# Altium PCB Hall_Voltage.PcbDoc
Units mm, origin at the board's own origin, x right, y up, seen from the top; angles counter-clockwise.
Board outline 100 x 100 mm, 2 copper layers (Top Layer, Bottom Layer); 40 components, 28 nets, 120 pads, 0 vias.
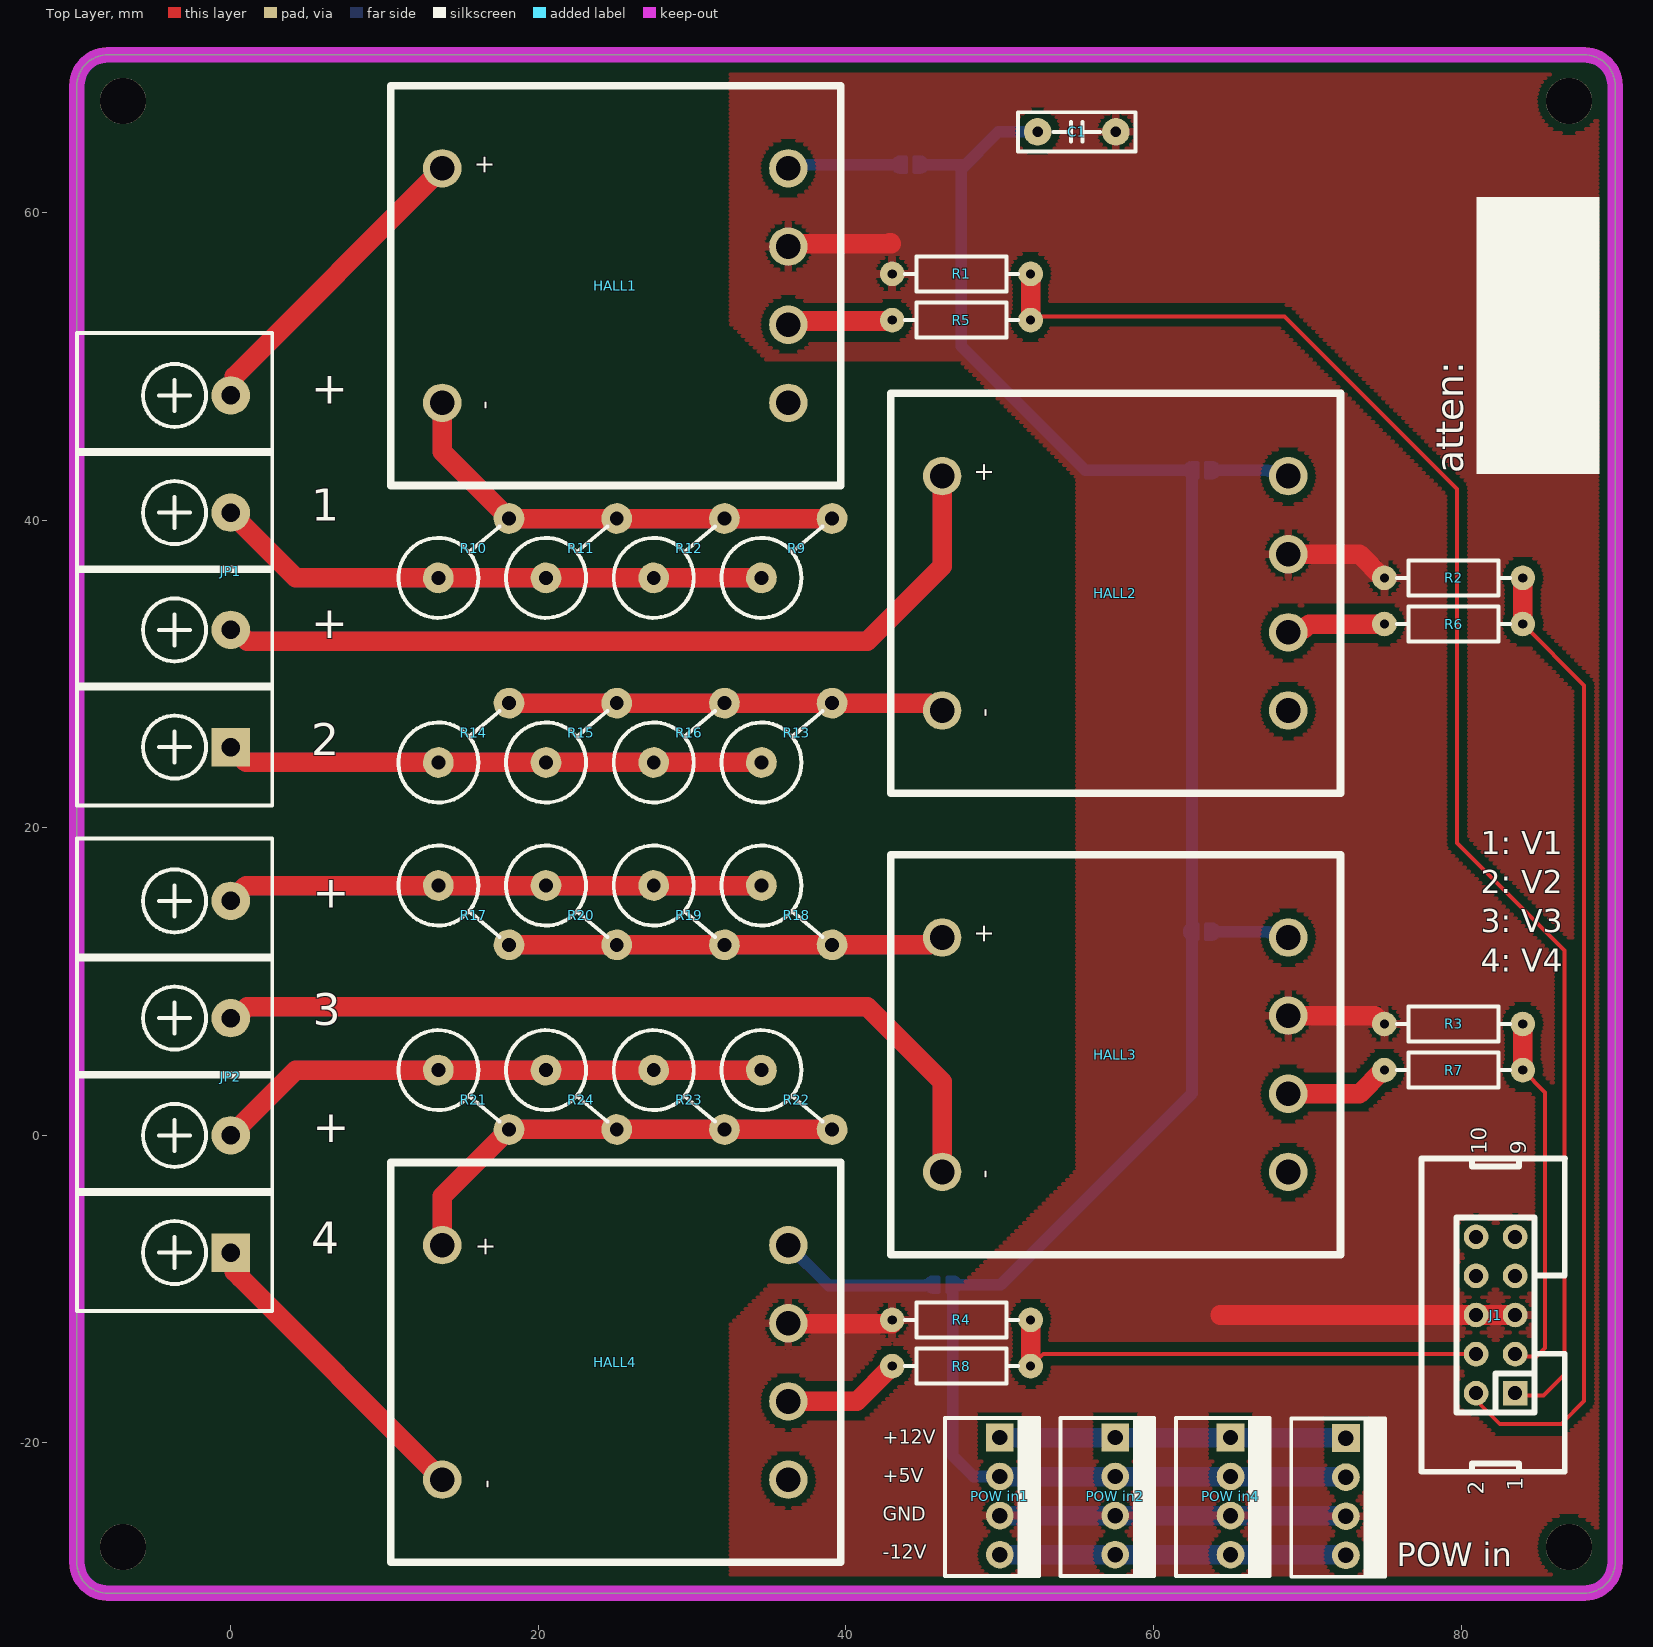
[diagram p0: Top Layer view]
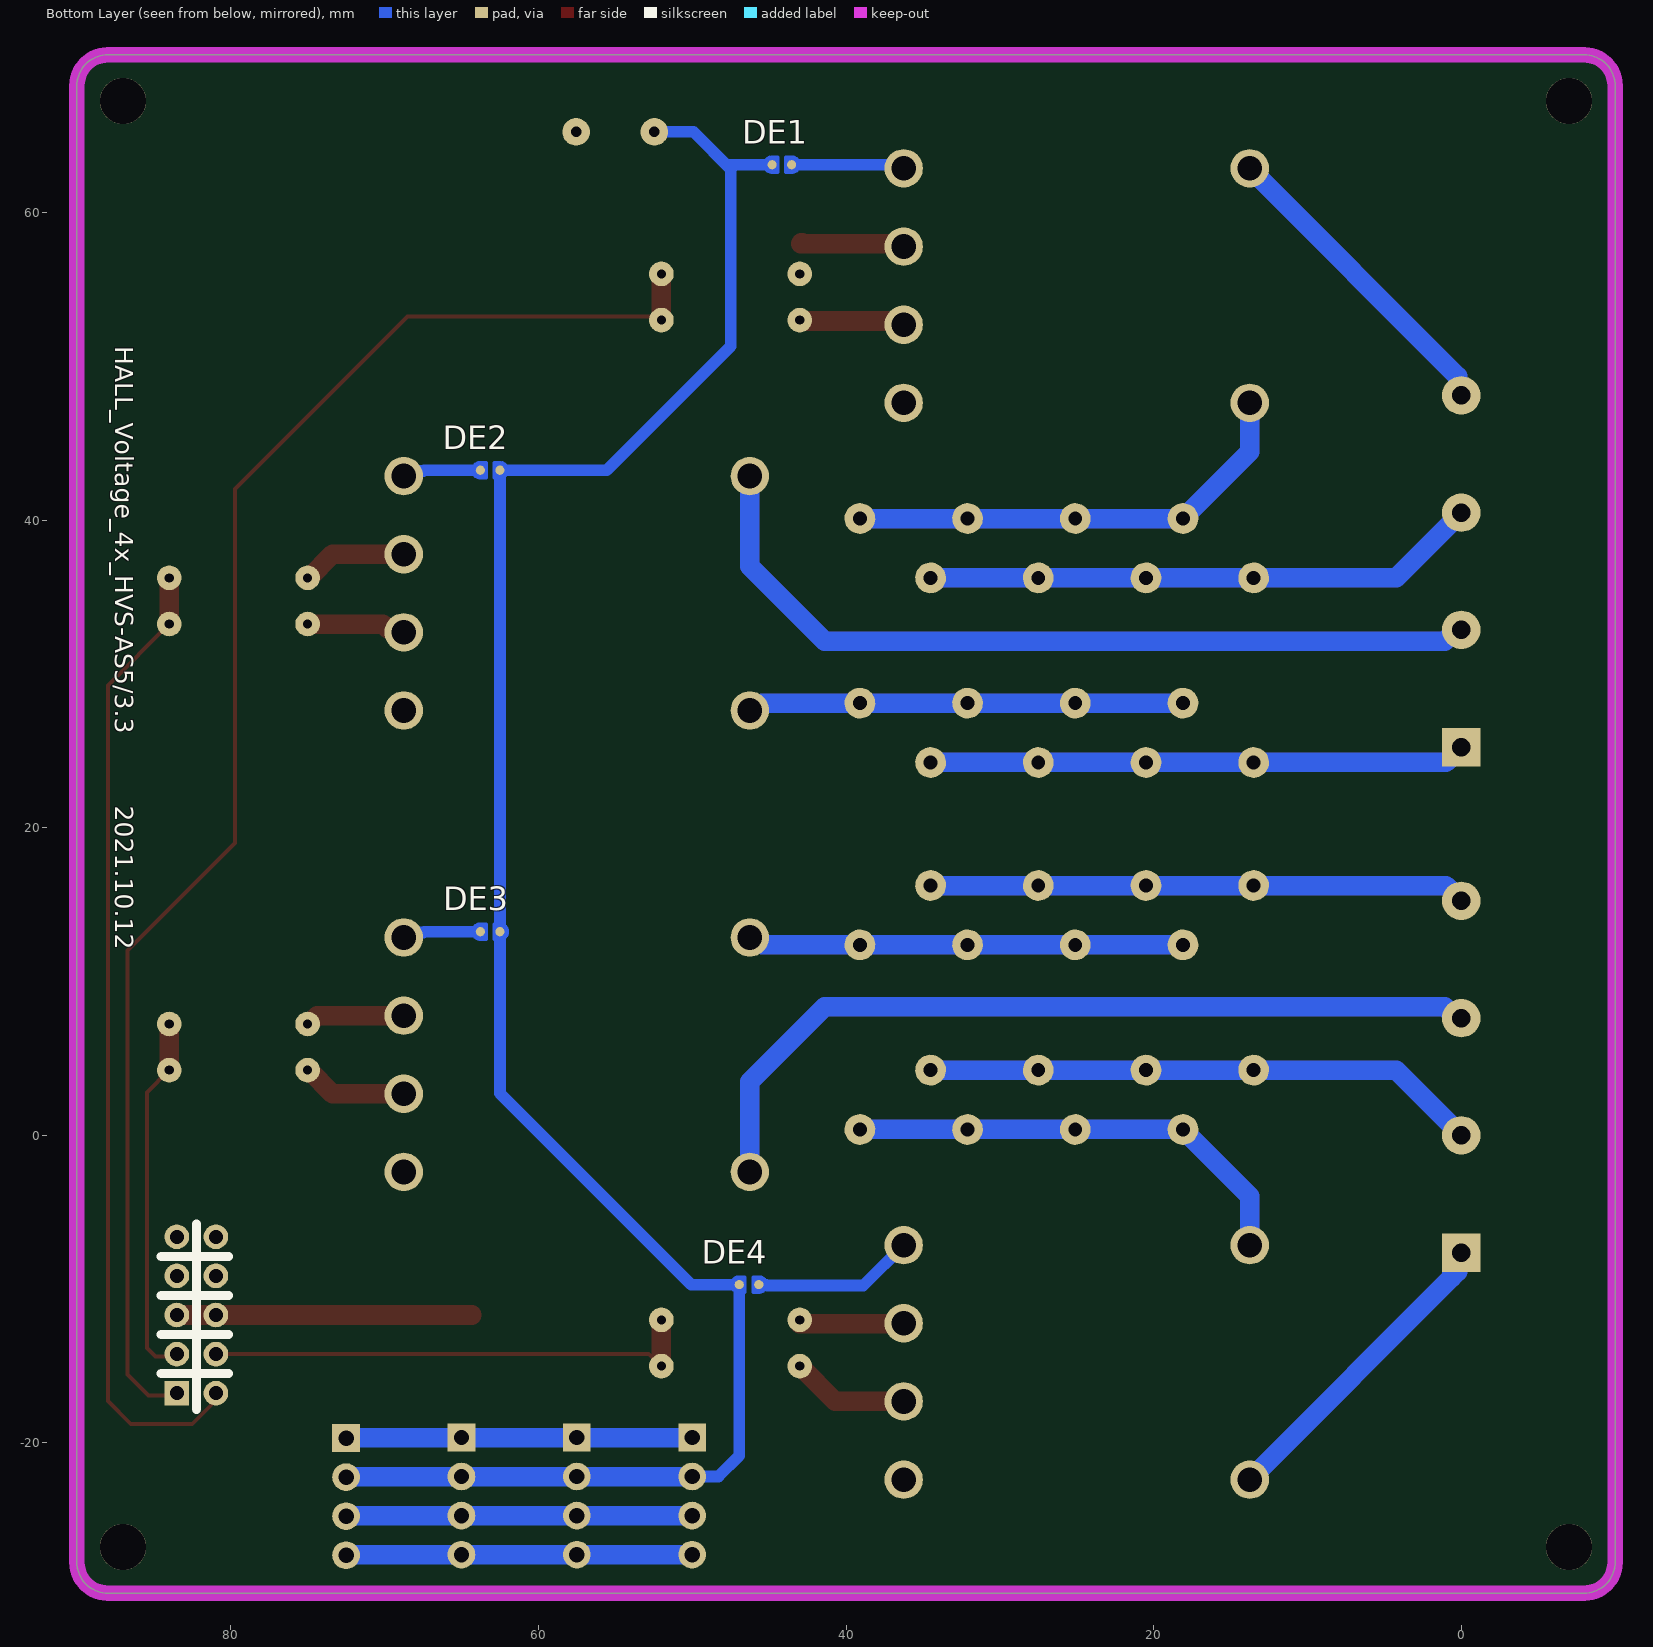
[diagram p1: Bottom Layer view, seen from below]

## Layer stack, top to bottom
Top Solder: solder mask 0.0102, Solder Resist, Dk 3.5
Top Layer: signal copper 0.0356
Dielectric 1: dielectric 0.32, FR-4, Dk 4.8
Bottom Layer: signal copper 0.0356
Bottom Solder: solder mask 0.0102, Solder Resist, Dk 3.5

## Board outline
-10,-27.76 -10,68.24 cw(c-8,68.24) -8,70.24 88,70.24 cw(c88,68.24) 90,68.24 90,-27.76 cw(c88,-27.76) 88,-29.76 -8,-29.76 cw(c-8,-27.76)

## Design rules (kind name [scope] priority, off if disabled: settings)
Clearance [All] p1: gap=0.508 ignorepadtopadclearanceinfootprint=FALSE except(0: Arc-Hole Track-Hole SMDPad-Hole THPad-Hole Via-Hole Text-Hole; 0.254: Arc-Arc Arc-Track Arc-SMDPad Arc-THPad Arc-Via Arc-Text Track-Track Track-SMDPad Track-THPad Track-Via Track-Text SMDPad-SMDPad SMDPad-THPad SMDPad-Via SMDPad-Text THPad-THPad THPad-Via THPad-Text Via-Via Via-Text Text-Text)
PolygonConnect [All] p1: thpad.connectstyle=Relief thpad.reliefconductorwidth=0.508 thpad.reliefentries=4 thpad.polygonreliefangle="90 Angle" thpad.airgapwidth=0.254 smdpad.connectstyle=Relief smdpad.reliefconductorwidth=0.254 smdpad.reliefentries=4 smdpad.polygonreliefangle="90 Angle" smdpad.airgapwidth=0.254 via.connectstyle=Direct via.reliefconductorwidth=0.254 via.reliefentries=4 via.polygonreliefangle="90 Angle" via.airgapwidth=0.254
RoutingVias [All] p1: holewidth=0.711 width=1.27 viastyle="Through Hole" minholewidth=0.711 minwidth=1.27 maxholewidth=0.711 maxwidth=1.27
SolderMaskExpansion [All] p1: expansion=0.102 istentingtop=FALSE
Width [All] p1: maxlimit=2.54 minlimit=0.254 preferedwidth=0.254
30 further rules are at their usual default settings.

## Components (designator, comment, footprint, x,y, rotation, side; value= is the part's Value field where it differs from the comment)
C1 "105" MLCC5.08-A 55,65.24 r0 top
DE1 "DEBUG PAD" DEBUG_B#1 44.17,63.1 r180 bottom
DE2 "DEBUG PAD" DEBUG_B#2 63.135,43.24 r0 bottom
DE3 "DEBUG PAD" DEBUG_B#3 63.135,13.24 r0 bottom
DE4 "DEBUG PAD" DEBUG_B#4 46.304,-9.705 r180 bottom
HALL1 "HVS AS5/3.3" "HVS AS5/3.3" 25,55.24 r90 top
HALL2 "HVS AS5/3.3" "HVS AS5/3.3" 57.5,35.24 r90 top
HALL3 "HVS AS5/3.3" "HVS AS5/3.3" 57.5,5.24 r90 top
HALL4 "HVS AS5/3.3" "HVS AS5/3.3" 25,-14.76 r90 top
J1 "Header 5X2" IDC2.54-LI-2x5P 83.5,-16.76 r90 top
JP1 "HDR-1X4" KF7620-4P -3.65,36.67 r90 top
JP2 "HDR-1X4" KF7620-4P -3.65,3.81 r90 top
"POW in" "HDR-1X4" KF2510-LI-4P 72.5,-23.49 r270 top (schematic designator "POW in3")
"POW in1" "HDR-1X4" KF2510-LI-4P 50,-23.45 r270 top
"POW in2" "HDR-1X4" KF2510-LI-4P 57.5,-23.45 r270 top
"POW in4" "HDR-1X4" KF2510-LI-4P 65,-23.45 r270 top
R1 "10K" "RS 1/4W" 47.5,56 r180 top
R2 "10K" "RS 1/4W" 79.5,36.24 r180 top
R3 "10K" "RS 1/4W" 79.5,7.24 r180 top
R4 "10K" "RS 1/4W" 47.5,-12 r180 top
R5 "10K" "RS 1/4W" 47.5,53 r0 top
R6 "10K" "RS 1/4W" 79.5,33.24 r0 top
R7 "10K" "RS 1/4W" 79.5,4.24 r0 top
R8 "10K" "RS 1/4W" 47.5,-15 r0 top
R9 "51k" "RS 2W-V6" 34.5,36.24 r40 top
R10 "51k" "RS 2W-V6" 13.5,36.24 r40 top
R11 "51k" "RS 2W-V6" 20.5,36.24 r40 top
R12 "51k" "RS 2W-V6" 27.5,36.24 r40 top
R13 "51k" "RS 2W-V6" 34.5,24.24 r40 top
R14 "51k" "RS 2W-V6" 13.5,24.24 r40 top
R15 "51k" "RS 2W-V6" 20.5,24.24 r40 top
R16 "51k" "RS 2W-V6" 27.5,24.24 r40 top
R17 "51k" "RS 2W-V6" 13.5,16.24 r320 top
R18 "51k" "RS 2W-V6" 34.5,16.24 r320 top
R19 "51k" "RS 2W-V6" 27.5,16.24 r320 top
R20 "51k" "RS 2W-V6" 20.5,16.24 r320 top
R21 "51k" "RS 2W-V6" 13.5,4.24 r320 top
R22 "51k" "RS 2W-V6" 34.5,4.24 r320 top
R23 "51k" "RS 2W-V6" 27.5,4.24 r320 top
R24 "51k" "RS 2W-V6" 20.5,4.24 r320 top

## Footprints (in the part's own frame and the unit in brackets; to place one, negate y for a bottom-side part, rotate by r counter-clockwise, add the part's x,y. Pads: shape width x height; smd on the part's side, far side on the other; paste and mask are expansions set on the pad)
DEBUG_B#1 [mm] "调试断点焊盘"
  round 0.6 smd paste-0.6: 1(-0.635,0) 2(0.635,0)
  Top Layer region: 0.254,-0.508 0.762,-0.508 0.908,-0.479 1.031,-0.396 1.114,-0.273 1.143,-0.127 1.143,-0.127 1.143,0 1.104,0.194 0.994,0.359 0.829,0.469 0.635,0.508 0.635,0.508 0.254,0.508
  Top Layer region: -0.254,0.508 -0.762,0.508 -0.908,0.479 -1.031,0.396 -1.114,0.273 -1.143,0.127 -1.143,0.127 -1.143,0 -1.104,-0.194 -0.994,-0.359 -0.829,-0.469 -0.635,-0.508 -0.635,-0.508 -0.254,-0.508
  Top Layer lines w0.203: 1.143,0 cw(c0.635,0) 0.635,-0.508 0.254,-0.508 0.254,0 0.254,0.508 0.635,0.508 cw(c0.635,0) 1.143,0 ; -0.254,-0.508 -0.254,0 -0.254,0.508 -0.635,0.508 ccw(c-0.635,0) -1.143,0 ccw(c-0.635,0) -0.635,-0.508 -0.254,-0.508
DEBUG_B#2 [mm] "调试断点焊盘"
  round 0.6 smd paste-0.6: 1(-0.635,0) 2(0.635,0)
  Top Layer region: 0.254,-0.508 0.762,-0.508 0.908,-0.479 1.031,-0.396 1.114,-0.273 1.143,-0.127 1.143,-0.127 1.143,0 1.104,0.194 0.994,0.359 0.829,0.469 0.635,0.508 0.635,0.508 0.254,0.508
  Top Layer region: -0.254,0.508 -0.762,0.508 -0.908,0.479 -1.031,0.396 -1.114,0.273 -1.143,0.127 -1.143,0.127 -1.143,0 -1.104,-0.194 -0.994,-0.359 -0.829,-0.469 -0.635,-0.508 -0.635,-0.508 -0.254,-0.508
  Top Layer lines w0.203: -1.143,0 ccw(c-0.635,0) -0.994,-0.359 ccw(c-0.635,0) -0.635,-0.508 -0.254,-0.508 -0.254,0 -0.254,0.508 -0.635,0.508 ccw(c-0.635,0) -1.143,0 ; 0.254,0.508 0.635,0.508 cw(c0.635,0) 1.143,0 cw(c0.635,0) 0.635,-0.508 0.254,-0.508 0.254,0 0.254,0.508
DEBUG_B#3 [mm] "调试断点焊盘"
  round 0.6 smd paste-0.6: 1(-0.635,0) 2(0.635,0)
  Top Layer region: 0.254,-0.508 0.762,-0.508 0.908,-0.479 1.031,-0.396 1.114,-0.273 1.143,-0.127 1.143,-0.127 1.143,0 1.104,0.194 0.994,0.359 0.829,0.469 0.635,0.508 0.635,0.508 0.254,0.508
  Top Layer region: -0.254,0.508 -0.762,0.508 -0.908,0.479 -1.031,0.396 -1.114,0.273 -1.143,0.127 -1.143,0.127 -1.143,0 -1.104,-0.194 -0.994,-0.359 -0.829,-0.469 -0.635,-0.508 -0.635,-0.508 -0.254,-0.508
  Top Layer lines w0.203: -0.635,0.508 ccw(c-0.635,0) -0.635,-0.508 -0.254,-0.508 -0.254,0 -0.254,0.508 -0.635,0.508 ; 0.254,0.508 0.635,0.508 cw(c0.635,0) 1.143,0 cw(c0.635,0) 0.635,-0.508 0.254,-0.508 0.254,0 0.254,0.508
DEBUG_B#4 [mm] "调试断点焊盘"
  round 0.6 smd paste-0.6: 1(-0.635,0) 2(0.635,0)
  Top Layer region: 0.254,-0.508 0.762,-0.508 0.908,-0.479 1.031,-0.396 1.114,-0.273 1.143,-0.127 1.143,-0.127 1.143,0 1.104,0.194 0.994,0.359 0.829,0.469 0.635,0.508 0.635,0.508 0.254,0.508
  Top Layer region: -0.254,0.508 -0.762,0.508 -0.908,0.479 -1.031,0.396 -1.114,0.273 -1.143,0.127 -1.143,0.127 -1.143,0 -1.104,-0.194 -0.994,-0.359 -0.829,-0.469 -0.635,-0.508 -0.635,-0.508 -0.254,-0.508
  Top Layer lines w0.203: 1.143,0 ccw(c0.635,0) 1.123,0.14 ccw(c0.635,0) 1.104,0.194 ccw(c0.635,0) 0.635,0.508 0.254,0.508 0.254,0 0.254,-0.508 0.635,-0.508 ccw(c0.635,0) 1.143,0 ; -0.254,-0.508 -0.254,0 -0.254,0.508 -0.635,0.508 ccw(c-0.635,0) -0.994,0.359 ccw(c-0.635,0) -1.098,0.209 ccw(c-0.635,0) -1.143,0 ccw(c-0.635,0) -0.994,-0.359 ccw(c-0.635,0) -0.635,-0.508 -0.254,-0.508
"HVS AS5/3.3" [mm] "霍尔电压传感器"
  round 2.5 hole 1.6: 1(7.62,11.25) 2(-7.62,11.25) 3(7.62,-11.25) 4(2.54,-11.25) 5(-2.54,-11.25) 6(-7.62,-11.25)
  silkscreen extent -13,-14.65 13,14.59
IDC2.54-LI-2x5P [mm] "10P简易牛角座"
  rect 1.6x1.6 hole 0.9: 1(0,0)
  round 1.6 hole 0.9: 2(0,2.54) 3(2.54,0) 4(2.54,2.54) 5(5.08,0) 6(5.08,2.54) 7(7.62,0) 8(7.62,2.54) 9(10.16,0) 10(10.16,2.54)
  silkscreen extent -5.11,-3.23 15.27,6.1, body extent -5.08,-3.08 15.24,5.77, height 9.17
KF2510-LI-4P [mm] "接插件/2A"
  rect 1.8x1.8 hole 1: 1(-3.81,0)
  round 1.8 hole 1: 2(-1.27,0) 3(1.27,0) 4(3.81,0)
  silkscreen extent -5.08,-3.56 5.21,2.54, body extent -5.08,-3.5 5.08,2.4, height 11.05
KF7620-4P [mm] "30.5*12*12mm(长宽高)"
  rect 2.5x2.5 hole 1.2: 1(-11.43,-3.65)
  round 2.5 hole 1.2: 2(-3.81,-3.65) 3(3.81,-3.65) 4(11.43,-3.65)
  silkscreen extent -15.24,-6.35 15.49,6.35, body extent -15.24,-6.2 15.94,6.2, height 12.45
MLCC5.08-A [mm] "独石电容，脚距5.08mmhttps://item.taobao.com/item.htm?ft=t&id=613637044352"
  round 1.8 hole 0.7: 1(-2.54,0) 2(2.54,0)
  silkscreen extent -3.81,-1.27 3.81,1.27, body extent -2.79,-1 2.79,1, height 3.71
"RS 1/4W" [mm] "直插色环电阻，脚距9mm，直径2.3mm  https://item.taobao.com/item.htm?ft=t&id=613637044352"
  round 1.6 hole 0.6: 1(-4.5,0) 2(4.5,0)
  silkscreen extent -3.68,-1.14 3.68,1.14, body extent -4.72,-1.16 4.73,1.16, height 2.32
"RS 2W-V6" [mm] "直插色环电阻，脚距6mm，直径5mm"
  round 2 hole 0.9: 1(6,0) 2(0,0)
  silkscreen extent -2.6,-2.6 5.2,2.6, body extent -2.51,-2.51 6.4,2.51, height 17.6

## Part data
C1: library part C-MLCC, "独石电容", BOM名称=独石电容, 下单链接=https://item.taobao.com/item.htm?ft=t&id=613637044352, 淘宝ID=小糖豆的小窝窝
DE1 DE2 DE3 DE4: library part DEBUG, "调试断点焊盘", BOM名称=调试断点焊盘, 下单链接=https://item.taobao.com/item.htm?ft=t&id=613637044352, 淘宝ID=小糖豆的小窝窝
HALL1 HALL2 HALL3 HALL4: "霍尔电压传感器"
J1: "5*2P接插件", BOM名称=5*2P接插件, 下单链接=https://item.taobao.com/item.htm?ft=t&id=613637044352, 淘宝ID=小糖豆的小窝窝
JP1 JP2 "POW in" "POW in1" "POW in2" "POW in4": library part "Header 4", "4P接插件", BOM名称=4P接插件, 下单链接=https://item.taobao.com/item.htm?ft=t&id=613637044352, 淘宝ID=小糖豆的小窝窝
R1 R2 R3 R4 R5 R6 R7 R8 R9 R10 R11 R12 R13 R14 R15 R16 R17 R18 R19 R20 R21 R22 R23 R24: library part Res, "色环电阻", BOM名称=色环电阻, 下单链接=https://item.taobao.com/item.htm?ft=t&id=613637044352, 淘宝ID=小糖豆的小窝窝

## Free pads (board coordinates)
  round 3 hole 3: Q(-7,-26.76) Q(-7,67.24) Q(87,-26.76) Q(87,67.24)

## Nets (pads, with @x,y where several pads share a name; then routed paths per layer and width w, separated by ;. In a path a pad name is that pad's centre, name@x,y a point inside that pad or via, vN(x,y) a via of type N, cw(c..) or ccw(c..) an arc to the next point about the centre after c; other vN are vias at no path point)
1: J1.1 R1.1 R5.2 | length 99.7
  Top Layer w0.254: R5.2@52,53.24 68.5,53.24 79.73,42.01 79.73,19.01 86.715,12.025 86.715,-15.545 85.35,-16.91 83.65,-16.91 J1.1
  Top Layer w1.27: R5.2 R1.1
2: J1.2 R2.1 R6.2 | length 64.5
  Top Layer w0.254: J1.2@80.96,-16.176 80.96,-17.22 82.5,-18.76 86.5,-18.76 87.985,-17.275 87.985,29.255 R6.2
  Top Layer w1.27: R6.2 R2.1
3: J1.3 R3.1 R7.2 | length 23.9
  Top Layer w0.254: J1.3 83.65,-14.37 84.89,-14.37 85.445,-13.815 85.445,2.795 R7.2
  Top Layer w1.27: R7.2 R3.1
4: J1.4 R4.1 R8.2 | length 31.5
  Top Layer w0.254: R8.2@52.581,-14.461 52.822,-14.22 J1.4
  Top Layer w1.27: R8.2 R4.1
+5: "POW in1.2" "POW in2.2" "POW in4.2" "POW in.2" C1.1 DE1.1 DE2.1 DE3.1 DE4.1 | length 135.3
  Bottom Layer w0.762: 45.313,63.1 47.548,63.1 47.661,62.987 ; 46.939,-10.065 46.939,-10.213 46.939,-20.827 48.293,-22.18 50,-22.18 ; 47.447,-9.705 50.055,-9.705 62.5,2.74 62.5,12.732 ; 47.457,62.783 49.914,65.24 C1.1 ; 47.5,62.74 47.5,51.302 55.562,43.24 61.992,43.24 62.141,43.24 DE2.1 62.5,42.732 62.5,13.748 DE3.1
  Bottom Layer w1.27: 50,-22.18 50.02,-22.2 57.5,-22.2 65,-22.2 72.48,-22.2 72.5,-22.22
+12: "POW in1.1" "POW in2.1" "POW in4.1" "POW in.1" | length 22.5
  Bottom Layer w1.27: 50,-19.64 50.02,-19.66 72.48,-19.66 72.5,-19.68
-12: "POW in1.4" "POW in2.4" "POW in4.4" "POW in.4" | length 22.5
  Bottom Layer w1.27: 50,-27.26 50.02,-27.28 72.48,-27.28 72.5,-27.3
GND: "POW in1.3" "POW in2.3" "POW in4.3" "POW in.3" C1.2 HALL1.4 HALL2.4 HALL3.4 HALL4.4 J1.5 J1.6 R1.2 R2.2 R3.2 R4.2 | length 68.6
  Top Layer w1.27: HALL4.4 36.29,-12.26 R4.2@43,-12.26 ; HALL1.4 36.427,57.957 42.934,57.957 ; 42.845,58.02 42.9,58.02 ; 64.34,-11.68 J1.6 J1.5 ; HALL3.4 74.371,7.78 74.911,7.24 R3.2 ; HALL2.4 73.371,37.78 74.911,36.24 R2.2
  Bottom Layer w1.27: 50,-24.72 50.02,-24.74 72.48,-24.74 72.5,-24.76
NetDE1_2: DE1.2 HALL1.3 | length 7.4
  Bottom Layer w0.762: HALL1.3 36.49,63.1 DE1.2
NetDE2_2: DE2.2 HALL2.3 | length 5.1
  Bottom Layer w0.762: DE2.2 64.278,43.24 67.435,43.24 67.482,43.193 68.417,43.193 HALL2.3
NetDE3_2: DE3.2 HALL3.3 | length 5.1
  Bottom Layer w0.762: DE3.2 64.278,13.24 67.435,13.24 67.482,13.193 68.417,13.193 HALL3.3
NetDE4_2: DE4.2 HALL4.3 | length 10
  Bottom Layer w0.762: HALL4.3 38.87,-9.76 45.107,-9.76 45.161,-9.705
NetHALL1_1: HALL1.1 JP1.4 | length 40.9
  Top Layer w1.27: JP1.4 0.235,48.335 0.235,49.345 HALL1.1
  Bottom Layer w1.27: JP1.4 0.235,48.335 0.235,49.345 HALL1.1
NetHALL1_2: HALL1.2 R9.1 R10.1 R11.1 R12.1 | length 60.6
  Top Layer w1.27: HALL1.2 13.75,44.443 R10.1 R11.1 R12.1 R9.1
  Bottom Layer w1.27: HALL1.2 13.75,44.443 R10.1 R11.1 R12.1 R9.1
NetHALL1_5: HALL1.5 R5.1 | length 6.7
  Top Layer w1.27: HALL1.5 36.485,52.935 37.355,52.935 37.36,52.94 42.5,52.94 R5.1@42.845,52.94
NetHALL2_1: HALL2.1 JP1.2 | length 108.9
  Top Layer w1.27: JP1.2 0.333,32.86 1.085,32.108 41.368,32.108 46.25,36.99 HALL2.1
  Bottom Layer w1.27: JP1.2 0.333,32.86 1.085,32.108 41.368,32.108 46.25,36.99 HALL2.1
NetHALL2_2: HALL2.2 R13.1 R14.1 R15.1 R16.1 | length 56.7
  Top Layer w1.27: R14.1 R15.1 R16.1 R13.1 45.44,28.097 45.917,27.62 HALL2.2
  Bottom Layer w1.27: R14.1 R15.1 R16.1 R13.1 45.44,28.097 45.917,27.62 HALL2.2
NetHALL2_5: HALL2.5 R6.1 | length 6.5
  Top Layer w1.27: HALL2.5 68.985,32.935 69.804,32.935 70.109,33.24 R6.1
NetHALL3_1: HALL3.1 R17.1 R18.1 R19.1 R20.1 | length 56.7
  Top Layer w1.27: R17.1 R20.1 R19.1 R18.1 45.44,12.383 45.917,12.86 HALL3.1
  Bottom Layer w1.27: R17.1 R20.1 R19.1 R18.1 45.44,12.383 45.917,12.86 HALL3.1
NetHALL3_2: HALL3.2 JP2.3 | length 108.9
  Top Layer w1.27: JP2.3 0.333,7.62 1.085,8.372 41.368,8.372 46.25,3.49 HALL3.2
  Bottom Layer w1.27: JP2.3 0.333,7.62 1.085,8.372 41.368,8.372 46.25,3.49 HALL3.2
NetHALL3_5: HALL3.5 R7.1 | length 6.9
  Top Layer w1.27: HALL3.5 73.371,2.7 74.911,4.24 R7.1
NetHALL4_1: HALL4.1 R21.1 R22.1 R23.1 R24.1 | length 60.6
  Top Layer w1.27: HALL4.1 13.75,-3.963 R21.1 R24.1 R23.1 R22.1
  Bottom Layer w1.27: HALL4.1 13.75,-3.963 R21.1 R24.1 R23.1 R22.1
NetHALL4_2: HALL4.2 JP2.1 | length 44.7
  Top Layer w1.27: 0.615,-9.245 0.615,-8.235 JP2.1 0.235,-7.855 0.235,-8.865 HALL4.2
  Bottom Layer w1.27: 0.615,-9.245 0.615,-8.235 JP2.1 0.235,-7.855 0.235,-8.865 HALL4.2
NetHALL4_5: HALL4.5 R8.1 | length 7.7
  Top Layer w1.27: HALL4.5 40.7,-17.3 R8.1
NetJP1_1: JP1.1 R13.2 R14.2 R15.2 R16.2 | length 69.8
  Top Layer w1.27: JP1.1 1,24.24 R14.2 R15.2 R16.2 R13.2
  Bottom Layer w1.27: JP1.1 1,24.24 R14.2 R15.2 R16.2 R13.2
NetJP1_3: JP1.3 R9.2 R10.2 R11.2 R12.2 | length 72.5
  Top Layer w1.27: JP1.3 4.24,36.24 R10.2 R11.2 R12.2 R9.2
  Bottom Layer w1.27: JP1.3 4.24,36.24 R10.2 R11.2 R12.2 R9.2
NetJP2_2: JP2.2 R21.2 R22.2 R23.2 R24.2 | length 72.5
  Top Layer w1.27: JP2.2 4.24,4.24 R21.2 R24.2 R23.2 R22.2
  Bottom Layer w1.27: JP2.2 4.24,4.24 R21.2 R24.2 R23.2 R22.2
NetJP2_4: JP2.4 R17.2 R18.2 R19.2 R20.2 | length 69.8
  Top Layer w1.27: JP2.4 1,16.24 R17.2 R20.2 R19.2 R18.2
  Bottom Layer w1.27: JP2.4 1,16.24 R17.2 R20.2 R19.2 R18.2
pads on no net: HALL1.6 HALL2.6 HALL3.6 HALL4.6 J1.7 J1.8 J1.9 J1.10

## Polygon pours and split planes (outlines as drawn)
GND on Top Layer "NONET_L02_P-001" (hatched Horizontal grid 0.254 track 0.254, remove dead copper, pour order 2): 32.5,52.74 35,50.24 47.5,50.24 55,42.74 55,-2.26 47.5,-9.76 35,-9.76 32.5,-12.26 32.5,-29.76 90,-29.76 90,70.24 32.5,70.24
no net on Top Layer "NONET_L02_P-001" (solid, remove dead copper, pour order 3): 45,-22.26

## Keep-outs
Keep-Out Layer:
  lines w1.016: 90,68.24 ccw(c88,68.24) 88,70.24 -8,70.24 ccw(c-8,68.24) -10,68.24 -10,-27.76 ccw(c-8,-27.76) -8,-29.76 88,-29.76 ccw(c88,-27.76) 90,-27.76 90,68.24 ; 90,68.24 90,68.24

## Silkscreen, mask and mechanical layers (free items; w line width, h text height)
Top Overlay:
  region: 89,43 89,61 81,61 81,43
  text "+" at 5.242,46.883 h3.56
  text "atten:" at 80.702,43.055 h3.05 r90
  text "1" at 5.242,39.263 h3.56
  text "+" at 5.242,31.643 h3.56
  text "2" at 5.242,24.023 h3.56
  text "1: V1" at 81.28,17.78 h2.54
  text "2: V2" at 81.28,15.24 h2.54
  text "+" at 5.323,14.106 h3.56
  text "3: V3" at 81.28,12.7 h2.54
  text "4: V4" at 81.28,10.16 h2.54
  text "3" at 5.323,6.486 h3.56
  text "+" at 5.323,-1.134 h3.56
  text "4" at 5.243,-8.394 h3.56
  text "+12V" at 42.404,-20.334 h1.52
  text "+5V" at 42.404,-22.834 h1.52
  text "GND" at 42.404,-25.334 h1.52
  text "-12V" at 42.404,-27.834 h1.52
Bottom Overlay:
  text "HALL_Voltage_4x_HVS-AS5/3.3         2021.10.12" at 87.905,51.291 h2.03 r90
Mechanical 1:
  lines w0.127: 90.064,-27.76 ccw(c90,-27.76) 90.064,-27.759 ; 90.064,-27.76 ccw(c90,-27.76) 90.064,-27.759 ; 90.064,-27.76 cw(c88,-27.76) 88,-29.824 -8,-29.824 cw(c-8,-27.76) -10.064,-27.76 -10.064,68.24 cw(c-8,68.24) -8,70.304 88,70.304 cw(c88,68.24) 90.064,68.24 90.064,-27.759 ; 90.064,-27.76 90.064,-27.759

## Text inside footprints (layer, text, board x,y; h text height)
HALL1: Top Overlay "+" at 17.413,62.409 h2.03 r90; Top Overlay "-" at 17.438,47.167 h2.03 r90
HALL2: Top Overlay "-" at 49.938,27.167 h2.03 r90; Top Overlay "+" at 49.913,42.408 h2.03 r90
HALL3: Top Overlay "+" at 49.913,12.408 h2.03 r90; Top Overlay "-" at 49.938,-2.833 h2.03 r90
HALL4: Top Overlay "-" at 17.543,-22.989 h2.03 r90; Top Overlay "+" at 17.501,-7.911 h2.03 r90
J1: Top Overlay "10" at 81.671,-1.215 h1.02 r90; Top Overlay "9" at 84.211,-1.215 h1.02 r90; Top Overlay "1" at 84.008,-23.11 h1.02 r90; Top Overlay "2" at 81.468,-23.364 h1.02 r90